# Altium PCB TaskAltium.PcbDoc
Units mm, origin at the board's own origin, x right, y up, seen from the top; angles counter-clockwise.
Board outline 65.02 x 56.52 mm, 2 copper layers (Top Layer, Bottom Layer), stack 1.581 mm thick; 17 components, 22 nets, 100 pads, 14 vias.
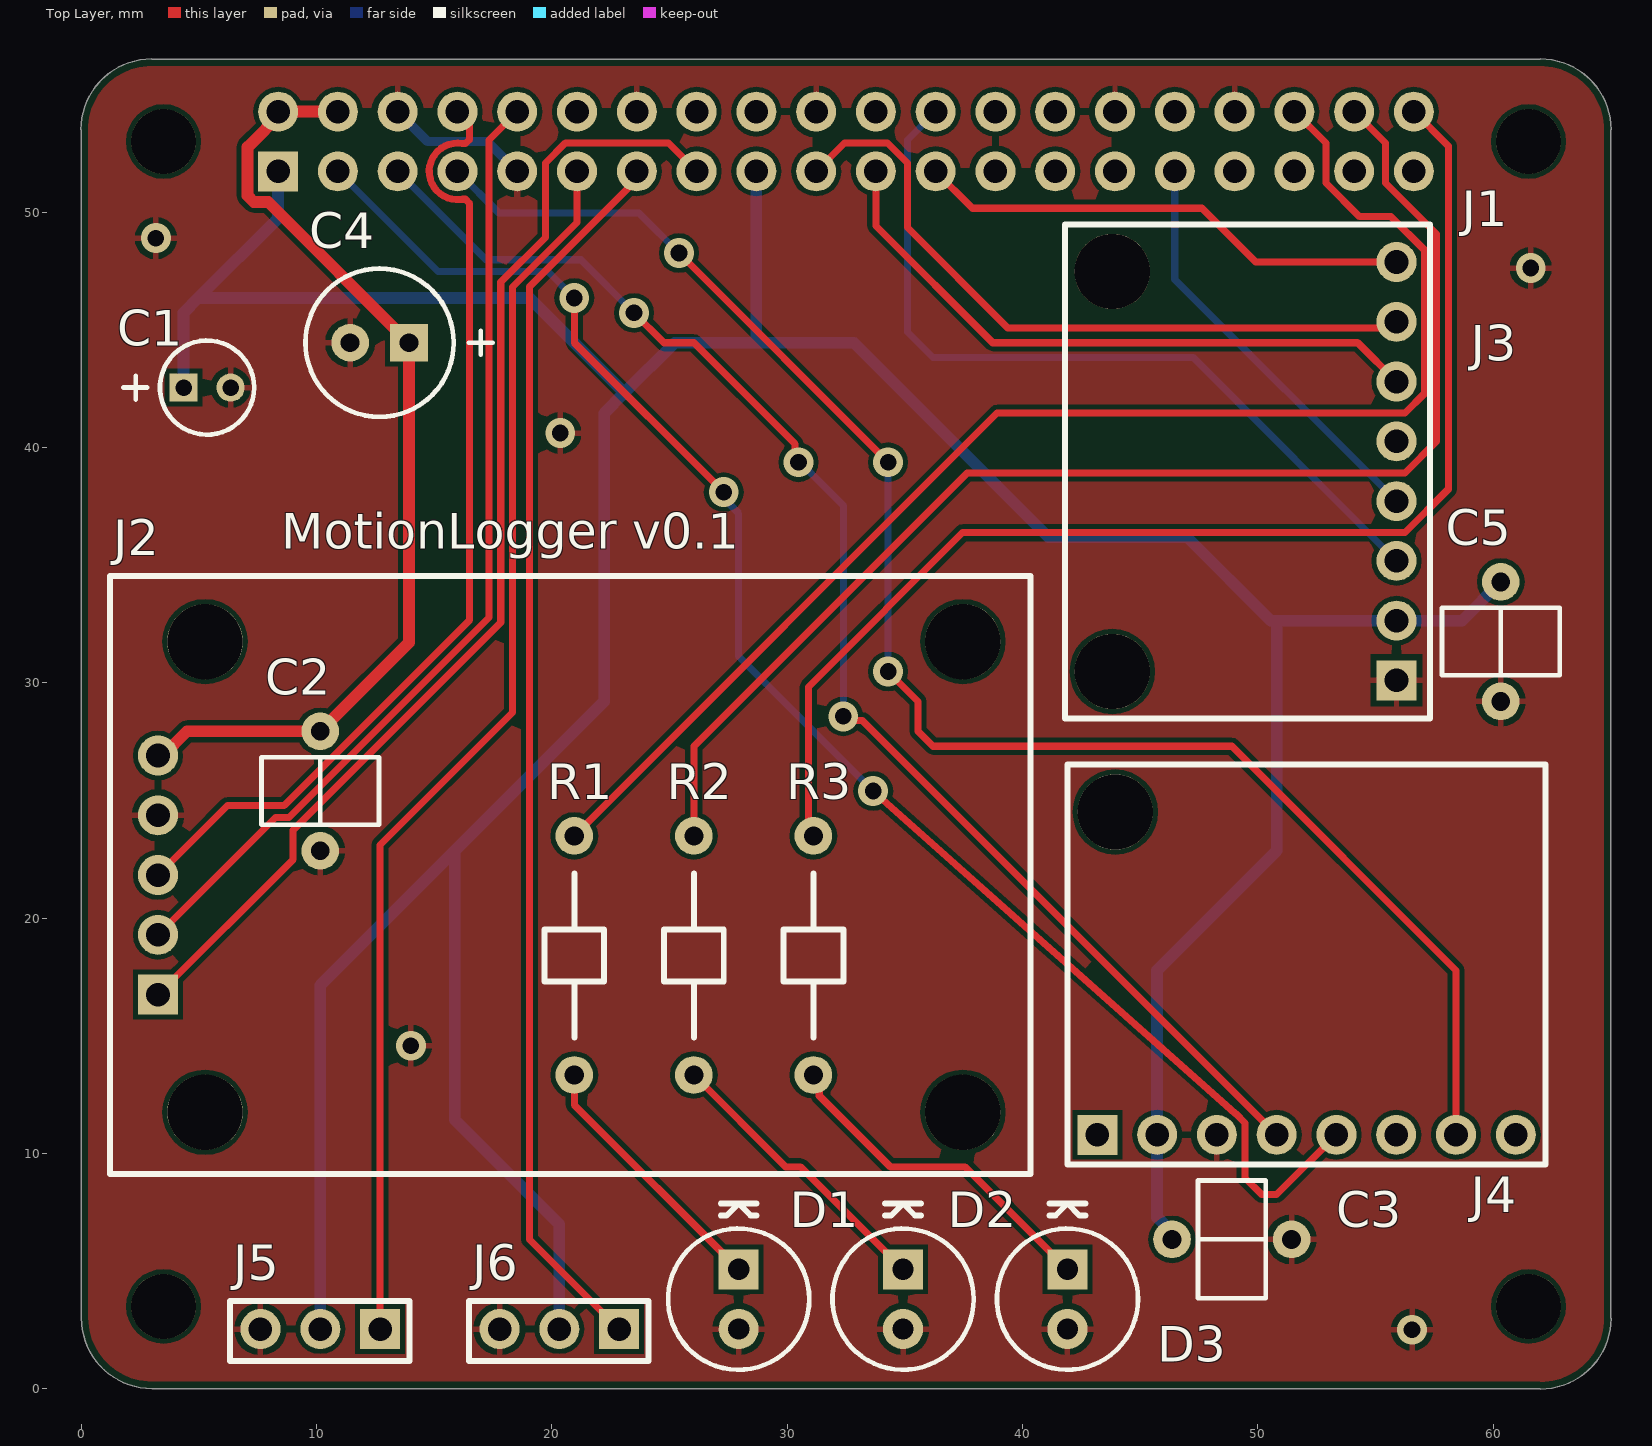
[diagram p0: Top Layer view]
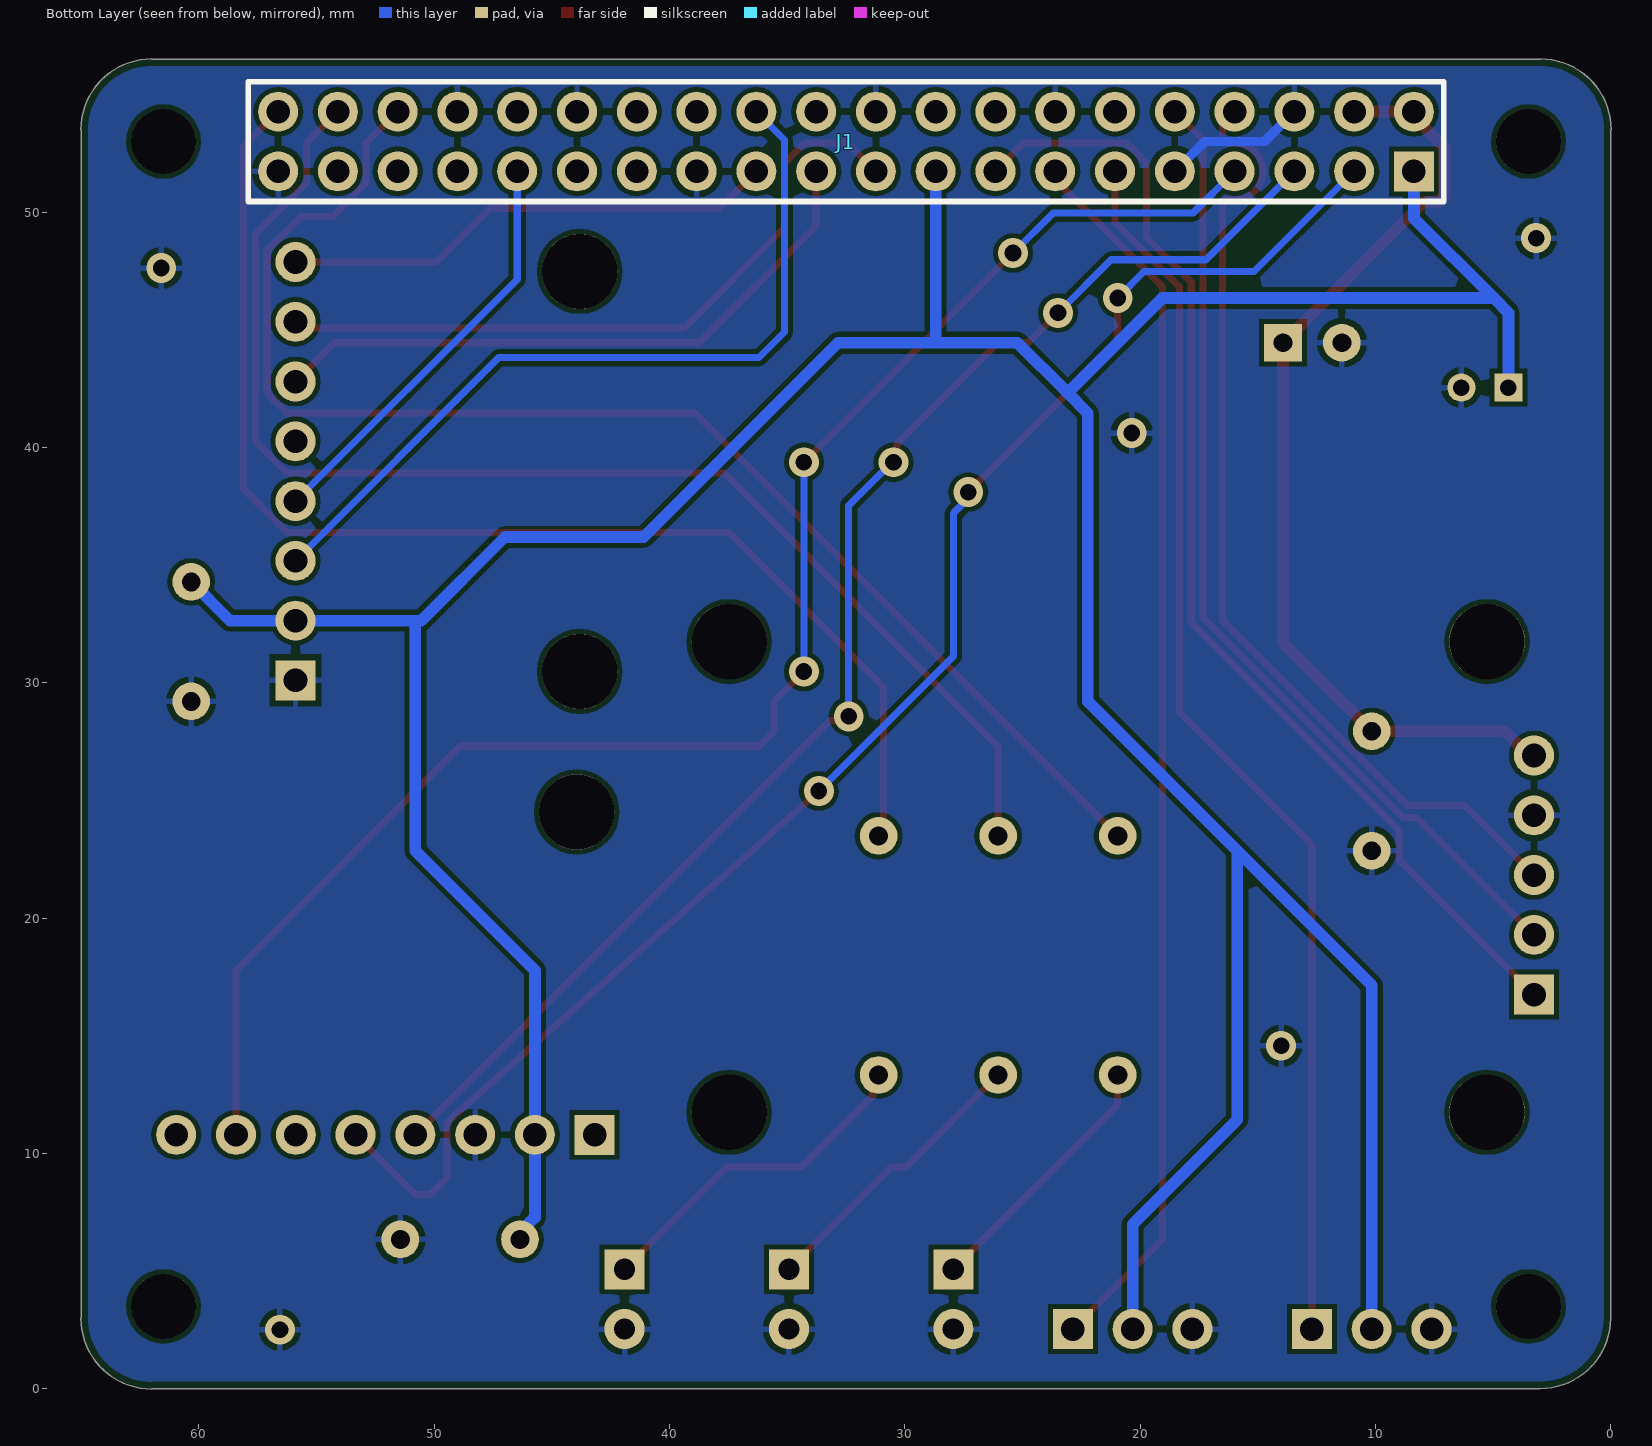
[diagram p1: Bottom Layer view, seen from below]

## Layer stack, top to bottom
Top Solder: solder mask 0.0102, Solder Resist, Dk 3.5
Top Layer: signal copper 0.0356
Dielectric 1: dielectric 1.51, FR-4, Dk 4.8
Bottom Layer: signal copper 0.0356
Bottom Solder: solder mask 0.0102, Solder Resist, Dk 3.5

## Board outline
0,3 0,53.5 -0.01,53.5 cw(c3,53.5) 3,56.51 3,56.5 62,56.5 62,56.51 cw(c62,53.5) 65.01,53.5 65,53.5 65,3 65.01,3 cw(c62,3) 62,-0.01 62,0 3,0 3,0.012 cw(c3,3)

## Design rules (kind name [scope] priority, off if disabled: settings)
BoardOutlineClearance [All] p1: gap=0.3 ignorepadtopadclearanceinfootprint=FALSE
Clearance [All] p1: gap=0.2 ignorepadtopadclearanceinfootprint=FALSE
HoleSize [All] p1: absolutevalues=TRUE maxlimit=6.5 minlimit=0.3 maxpercent=80.000 minpercent=20.000
PolygonConnect [All] p1: connectstyle=Relief reliefconductorwidth=0.254 reliefentries=4 polygonreliefangle="90 Angle" airgapwidth=0.254
RoutingVias [All] p1: holewidth=0.3 width=0.6 viastyle="Through Hole" minholewidth=0.3 minwidth=0.6 maxholewidth=0.3 maxwidth=0.6
SilkToSolderMaskClearance [IsPad] p1: minsilkscreentomaskgap=0.2 clearancetoexposedcopper=TRUE
SolderMaskExpansion [All] p1: expansion=0 istentingtop=FALSE
SupplyNets "Schematic Supply Nets_2" [InNet('3.3V')] p1: voltage=0.000
SupplyNets "Schematic Supply Nets_1" [InNet('GND')] p2: voltage=0.000
SupplyNets "Schematic Supply Nets" [InNet('5V')] p3: voltage=0.000
Width Power [InNet('5V') Or InNet('3.3V') Or InNet('GND')] p1: maxlimit=1.5 minlimit=0.4 preferedwidth=0.5
Width [All] p2: maxlimit=1 minlimit=0.2 preferedwidth=0.3
28 further rules are at their usual default settings.

## Components (designator, comment, footprint, x,y, rotation, side; value= is the part's Value field where it differs from the comment)
C1 "22uF" CAP_POL_SMALL 4.35,42.545 r0 top
C2 "100nF" CAP 10.16,22.86 r90 top
C3 "100nF" CAP 51.435,6.35 r180 top
C4 "33uF" CAPACITOR_POL 13.93,44.45 r180 top
C5 "100nF" CAP 60.325,34.29 r270 top
D1 "LED1" LED_5MM 27.94,5.08 r270 top
D2 "LED2" LED_5MM 34.925,5.08 r270 top
D3 "LED3" LED_5MM 41.91,5.08 r270 top
J1 "Raspberry Pi Header" HDR_2x20_2.54_BOTTOM 8.37,51.73 r270 bottom locked
J2 "NEO6M-GPS" HDR_1x5 3.265,16.75 r270 top
J3 "ACCEL_2" HDR_1x8_2MOUNT 55.815,29.98 r90 top
J4 "ACCEL_1" HDR_1x8_1MOUNT 43.18,10.795 r0 top
J5 "BUTTON" HDR_1X3 12.679,2.453 r180 top
J6 "BUTTON" HDR_1X3 22.839,2.453 r180 top
R1 "330" RESISTOR_AXIAL_400 20.955,23.495 r270 top
R2 "330" RESISTOR_AXIAL_400 26.035,23.495 r270 top
R3 "330" RESISTOR_AXIAL_400 31.115,23.495 r270 top

## Footprints (in the part's own frame and the unit in brackets; to place one, negate y for a bottom-side part, rotate by r counter-clockwise, add the part's x,y. Pads: shape width x height; smd on the part's side, far side on the other; paste and mask are expansions set on the pad)
CAP [mm]
  round 1.6 hole 0.8: 1(0,0) 2(5.08,0)
  silkscreen extent 1.11,-2.5 3.97,2.5
CAP_POL_SMALL [mm]
  rect 1.2x1.2 hole 0.7: 1(0,0)
  round 1.2 hole 0.7: 2(2,0)
  silkscreen extent -2.56,-2 3,2
CAPACITOR_POL [mm]
  rect 1.6x1.6 hole 0.8: 1(0,0)
  round 1.6 hole 0.8: 2(2.5,0)
  silkscreen extent -3.56,-3.15 4.4,3.15
HDR_1X3 [mm]
  rect 1.7x1.7 hole 1: 1(-0.021,-0.087)
  round 1.7 hole 1: 2(2.519,-0.087) 3(5.059,-0.087)
  silkscreen extent -1.27,-1.27 6.35,1.27, body extent -1.27,-1.27 6.35,1.27, height 8.5
HDR_1x5 [mm] "GNSS module"
  rect 1.7x1.7 hole 1: 1(0,0)
  round 1.7 hole 1: 2(-2.54,0) 3(-5.08,0) 4(-7.62,0) 5(-10.16,0)
  round 3.2 hole 3.2 unplated: MH(-15,34.2) MH(-15,2) MH(5,34.2) MH(5,2)
  silkscreen extent -17.78,-2.03 7.62,37.08, body extent -17.78,-2.03 7.62,37.08, height 8.5
HDR_1x8_1MOUNT [mm] "HW-290"
  rect 1.7x1.7 hole 1: 1(0,0)
  round 1.7 hole 1: 2(2.54,0) 3(5.08,0) 4(7.62,0) 5(10.16,0) 6(12.7,0) 7(15.24,0) 8(17.78,0)
  round 3.2 hole 3.2 unplated: MH(0.762,13.716)
  silkscreen extent -1.27,-1.27 19.05,15.73, body extent -1.27,-1.27 19.05,15.75, height 8.5
HDR_1x8_2MOUNT [mm] "ADXL345"
  rect 1.7x1.7 hole 1: 1(0.12,-0.077)
  round 1.7 hole 1: 2(2.66,-0.077) 3(5.2,-0.077) 4(7.74,-0.077) 5(10.28,-0.077) 6(12.82,-0.077) 7(15.36,-0.077) 8(17.9,-0.077)
  round 3.2 hole 3.2 unplated: MH(0.5,12) MH(17.5,12)
  silkscreen extent -1.5,-1.5 19.5,14, body extent -1.5,-1.5 19.5,14, height 8.5
HDR_2x20_2.54_BOTTOM [mm] "Raspberry Pi 5"
  rect 1.7x1.7 hole 1: 1(0,0)
  round 1.7 hole 1: 2(-2.54,0) 3(0,-2.54) 4(-2.54,-2.54) 5(0,-5.08) 6(-2.54,-5.08) 7(0,-7.62) 8(-2.54,-7.62) 9(0,-10.16) 10(-2.54,-10.16) 11(0,-12.7) 12(-2.54,-12.7) 13(0,-15.24) 14(-2.54,-15.24) 15(0,-17.78) 16(-2.54,-17.78) 17(0,-20.32) 18(-2.54,-20.32) 19(0,-22.86) 20(-2.54,-22.86) 21(0,-25.4) 22(-2.54,-25.4) 23(0,-27.94) 24(-2.54,-27.94) 25(0,-30.48) 26(-2.54,-30.48) 27(0,-33.02) 28(-2.54,-33.02) 29(0,-35.56) 30(-2.54,-35.56) 31(0,-38.1) 32(-2.54,-38.1) 33(0,-40.64) 34(-2.54,-40.64) 35(0,-43.18) 36(-2.54,-43.18) 37(0,-45.72) 38(-2.54,-45.72) 39(0,-48.26) 40(-2.54,-48.26)
  silkscreen extent -3.81,-49.53 1.27,1.27, body extent -3.81,-49.53 1.27,1.27, height 8.5
LED_5MM [mm]
  rect 1.7x1.7 hole 0.9: 1(0,0)
  round 1.7 hole 0.9: 2(2.54,0)
  silkscreen extent -2.79,-3 4.27,3
RESISTOR_AXIAL_400 [mil]
  round 63 hole 32: 1(0,0) 2(400,0)
  silkscreen extent 63,-50 337,50

## Part data
C1 C4: library part CAP_POL
C2 C3 C5: library part CAP
D1 D2 D3: library part LED
J1: library part RPI_HDR_2x20
J2: library part GPS_NEO6M
R1 R2 R3: library part RES

## Free pads (board coordinates)
  round 2.75 hole 2.75 unplated: MH(3.5,3.5) MH(3.5,53) MH(61.5,3.5) MH(61.5,53)

## Via types
v1: diameter 1.27, hole 0.711, Top Layer to Bottom Layer, 14 vias

## Nets (pads, with @x,y where several pads share a name; then routed paths per layer and width w, separated by ;. In a path a pad name is that pad's centre, name@x,y a point inside that pad or via, vN(x,y) a via of type N, cw(c..) or ccw(c..) an arc to the next point about the centre after c; other vN are vias at no path point)
3.3V: C1.1 C3.2 C5.1 J1.1 J1.17 J3.2 J4.2 J5.2 J6.2 | length 177.4
  Bottom Layer w0.5: C1.1 4.35,45.72 4.985,46.355 ; J1.1 8.37,49.74 4.985,46.355 ; J5.2 10.16,17.145 15.875,22.86 ; J6.2 20.32,6.985 15.875,11.43 15.875,22.86 ; 28.69,44.565 J1.17 ; C3.2 46.355,6.648 45.72,7.283 J4.2 45.72,17.78 50.8,22.86 50.8,32.64 ; C5.1 58.675,32.64 J3.2 50.8,32.64 ; 4.985,46.355 19.05,46.355 23.087,42.318 ; 15.875,22.86 22.225,29.21 22.225,41.457 23.087,42.318 ; 23.087,42.318 25.218,44.45 28.69,44.45 32.84,44.45 41.095,36.195 46.99,36.195 50.545,32.64 50.8,32.64
5V: C2.2 C4.1 J1.2 J1.4 J2.5 | length 41.4
  Top Layer w0.5: J2.5 3.468,26.91 4.498,27.94 C2.2 13.93,31.71 C4.1 7.95,50.43 7.334,50.43 7.07,50.694 7.07,52.766 8.574,54.27 J1.4
AC1_INT: J1.7 J4.7 | length 69.4
  Top Layer w0.3: v1(25.4,48.26) v1(34.29,39.37) ; v1(34.29,30.48) 35.56,29.21 35.56,27.94 36.195,27.305 48.895,27.305 58.42,17.78 J4.7
  Bottom Layer w0.3: J1.7 17.766,49.954 23.706,49.954 v1(25.4,48.26) ; v1(34.29,30.48) v1(34.29,39.37)
AC1_SCL: J1.5 J4.4 | length 59.9
  Top Layer w0.3: v1(23.495,45.72) 24.765,44.45 26.035,44.45 30.33,40.155 30.33,39.52 v1(30.48,39.37) ; v1(32.385,28.575) 32.571,28.389 33.206,28.389 J4.4
  Bottom Layer w0.3: J1.5 17.204,47.976 21.239,47.976 v1(23.495,45.72) ; v1(30.48,39.37) 30.552,39.37 32.385,37.537 v1(32.385,28.575)
AC1_SDA: J1.3 J4.5 | length 66.6
  Top Layer w0.3: 20.955,45.72 20.955,44.45 v1(27.305,38.1) ; v1(33.655,25.4) 49.058,11.691 ; 49.059,11.693 49.46,11.292 49.46,8.96 50.165,8.255 50.8,8.255 J4.5
  Bottom Layer w0.3: J1.3 15.164,47.476 19.834,47.476 v1(20.955,46.355) ; v1(27.305,38.1) 27.305,37.838 27.94,37.203 27.94,31.115 v1(33.655,25.4)
AC2_CS: J1.24 J3.3 | length 34.7
  Bottom Layer w0.3: J1.24 35.11,53.07 35.11,44.9 36.195,43.815 47.258,43.815 J3.3
AC2_INT: J1.31 J3.4 | length 17.9
  Bottom Layer w0.3: J1.31 46.47,47.143 J3.4
AC2_MISO: J1.21 J3.6 | length 27.2
  Top Layer w0.3: J1.21 33.77,49.415 38.735,44.45 54.243,44.45 J3.6
AC2_MOSI: J1.19 J3.7 | length 30.1
  Top Layer w0.3: J1.19 32.43,52.93 34.267,52.93 35.11,52.087 35.11,49.345 39.37,45.085 55.637,45.085 J3.7
AC2_SCLK: J1.23 J3.8 | length 21.2
  Top Layer w0.3: J1.23 37.875,50.165 47.625,50.165 49.91,47.88 J3.8
GND: C1.2 C2.1 C3.1 C4.2 C5.2 D1.2 D2.2 D3.2 J1.6 J1.9 J1.14 J1.20 J1.25 J1.30 J1.34 J1.39 J2.4 J3.1 J4.3 J5.3 J6.3 | length 6.1
  Bottom Layer w0.4: J1.6 14.72,53 17.26,53 J1.9
  other v1: 56.553,2.512 14.008,14.577 20.358,40.612 61.595,47.625 3.175,48.895
GPS_PPS: J1.15 J2.1 | length 49.4
  Top Layer w0.3: J2.1 9.01,22.495 9.01,23.749 17.83,32.569 17.83,47.026 19.73,48.926 19.73,52.087 20.573,52.93 24.95,52.93 J1.15
GPS_RX: J1.8 J2.3 | length 41.8
  Top Layer w0.3: J2.3 6.216,24.781 8.627,24.781 16.51,32.664 16.51,50.37 16.423,50.458 ccw(c16.21,50.246) 16.421,50.459 16.334,50.546 16.21,50.546 ; J1.8 16.51,53.75 16.51,53.09 16.422,53.002 16.334,52.914 16.21,52.914 16.187,52.914 ccw(c15.99,51.73) 16.113,50.536 16.209,50.546
GPS_TX: J1.10 J2.2 | length 41.6
  Top Layer w0.3: J2.2 8.256,24.281 8.834,24.281 17.33,32.777 17.33,53.07 J1.10
LED1: J1.36 R1.1 | length 59
  Top Layer w0.3: R1.1 38.92,41.46 56.249,41.46 57.092,42.303 57.092,48.377 55.664,49.805 54.318,49.805 52.89,51.233 52.89,52.93 J1.36
LED2: J1.38 R2.1 | length 56.2
  Top Layer w0.3: R2.1 26.035,27.305 37.65,38.92 56.249,38.92 57.592,40.263 57.592,49.071 55.43,51.233 55.43,52.93 J1.38
LED3: J1.40 R3.1 | length 53.7
  Top Layer w0.3: R3.1 30.9,23.71 30.9,29.825 37.455,36.38 56.249,36.38 58.092,38.223 58.092,52.808 J1.40
NetD1_1: D1.1 R1.2 | length 11.1
  Top Layer w0.3: R1.2 20.955,12.065 D1.1
NetD2_1: D2.1 R2.2 | length 12.3
  Top Layer w0.3: R2.2 29.937,9.433 30.572,9.433 D2.1
NetD3_1: D3.1 R3.2 | length 14.6
  Top Layer w0.3: R3.2 31.364,13.086 31.364,12.451 34.382,9.433 37.557,9.433 D3.1
S_BTN1: J1.11 J5.1 | length 52.7
  Top Layer w0.3: J5.1 12.7,23.111 18.33,28.741 18.33,46.819 21.07,49.559 J1.11
S_BTN2: J1.13 J6.1 | length 52.7
  Top Layer w0.3: J6.1 19.05,6.35 19.05,46.832 23.61,51.392 J1.13
pads on no net: J1.12 J1.16 J1.18 J1.22 J1.26 J1.27 J1.28 J1.29 J1.32 J1.33 J1.35 J1.37 J2.MH J3.5 J3.MH J4.1 J4.6 J4.8 J4.MH

## Polygon pours and split planes (outlines as drawn)
GND on Bottom Layer "GND_L02_P000" (solid, remove dead copper, pour order 0): 0,3 0,53.5 -0.01,53.5 cw(c3,53.5) 3,56.51 3,56.5 62,56.5 62,56.51 cw(c62,53.5) 65.01,53.5 65,53.5 65,3 65.01,3 cw(c62,3) 62,-0.01 62,0 3,0 3,0.012 cw(c3,3)
GND on Top Layer "GND_L01_P001" (solid, remove dead copper, pour order 1): 0,3 0,53.5 -0.01,53.5 cw(c3,53.5) 3,56.51 3,56.5 62,56.5 62,56.51 cw(c62,53.5) 65.01,53.5 65,53.5 65,3 65.01,3 cw(c62,3) 62,-0.01 62,0 3,0 3,0.012 cw(c3,3)

## Silkscreen, mask and mechanical layers (free items; w line width, h text height)
Top Overlay:
  text "MotionLogger v0.1" at 8.509,35.687 h1.52
Mechanical 1:
  lines w0.254: -0.01,53.5 cw(c3,53.5) 3,56.51 ; 0,3 0,53.5 ; 0.012,3 ccw(c3,3) 3,0.012 ; 3,0 62,0 ; 3,56.5 62,56.5 ; 62,-0.01 ccw(c62,3) 65.01,3 ; 62,56.51 cw(c62,53.5) 65.01,53.5 ; 65,3 65,53.5